# Altium PCB CLLC_PrimarySide_v8.PcbDoc
Units mm, origin at the board's own origin, x right, y up, seen from the top; angles counter-clockwise.
Board outline 143.4 x 151.8 mm, 4 copper layers (GND, SIG, HVDC, GND/OUTPUT), stack 1.369 mm thick; 86 components, 33 nets, 216 pads, 168 vias.
Unrouted connection lines stored in the file: 12.
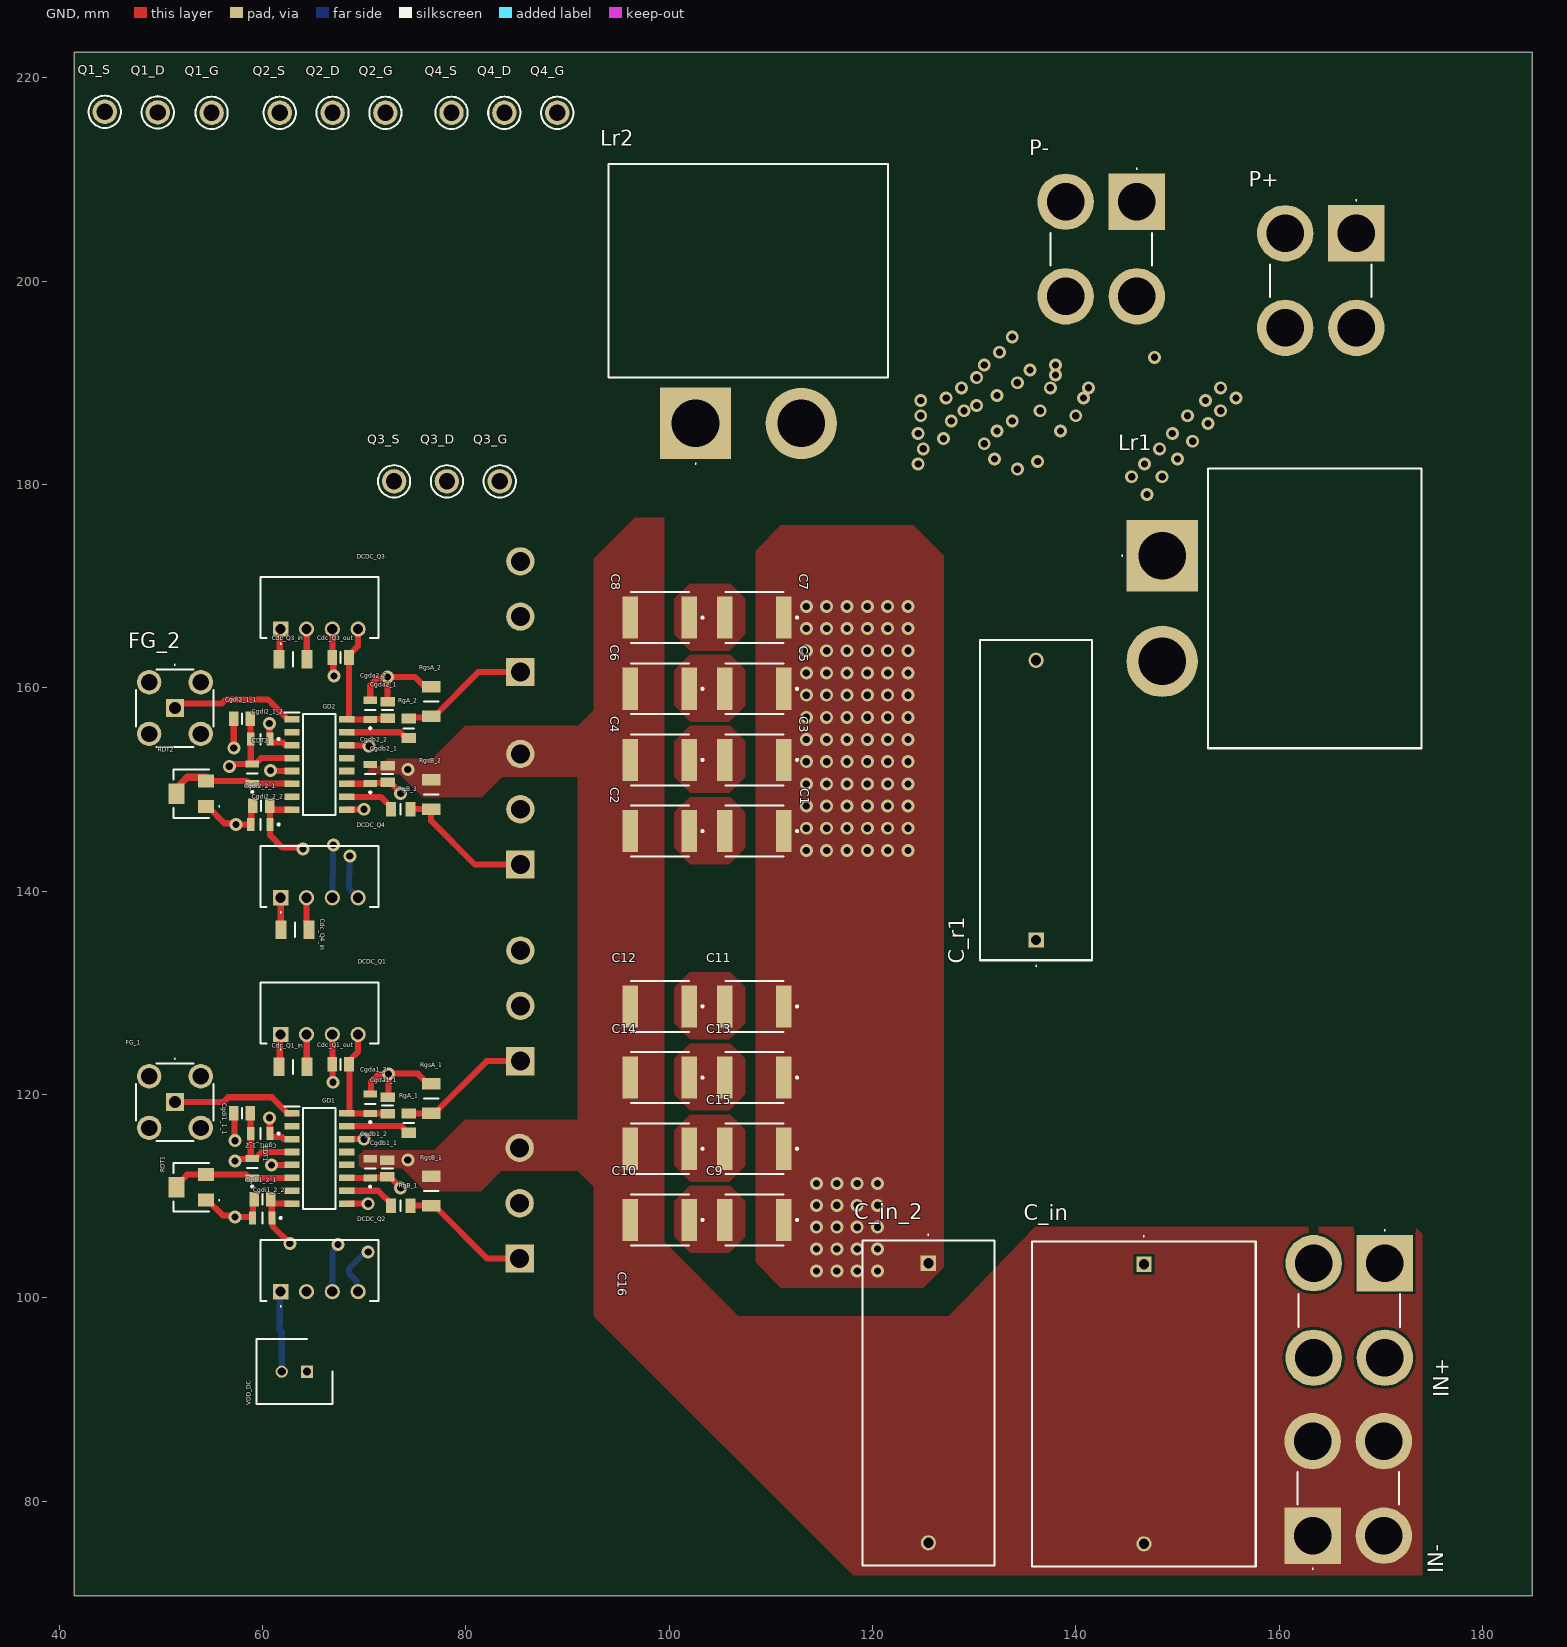
[diagram p0: GND view]
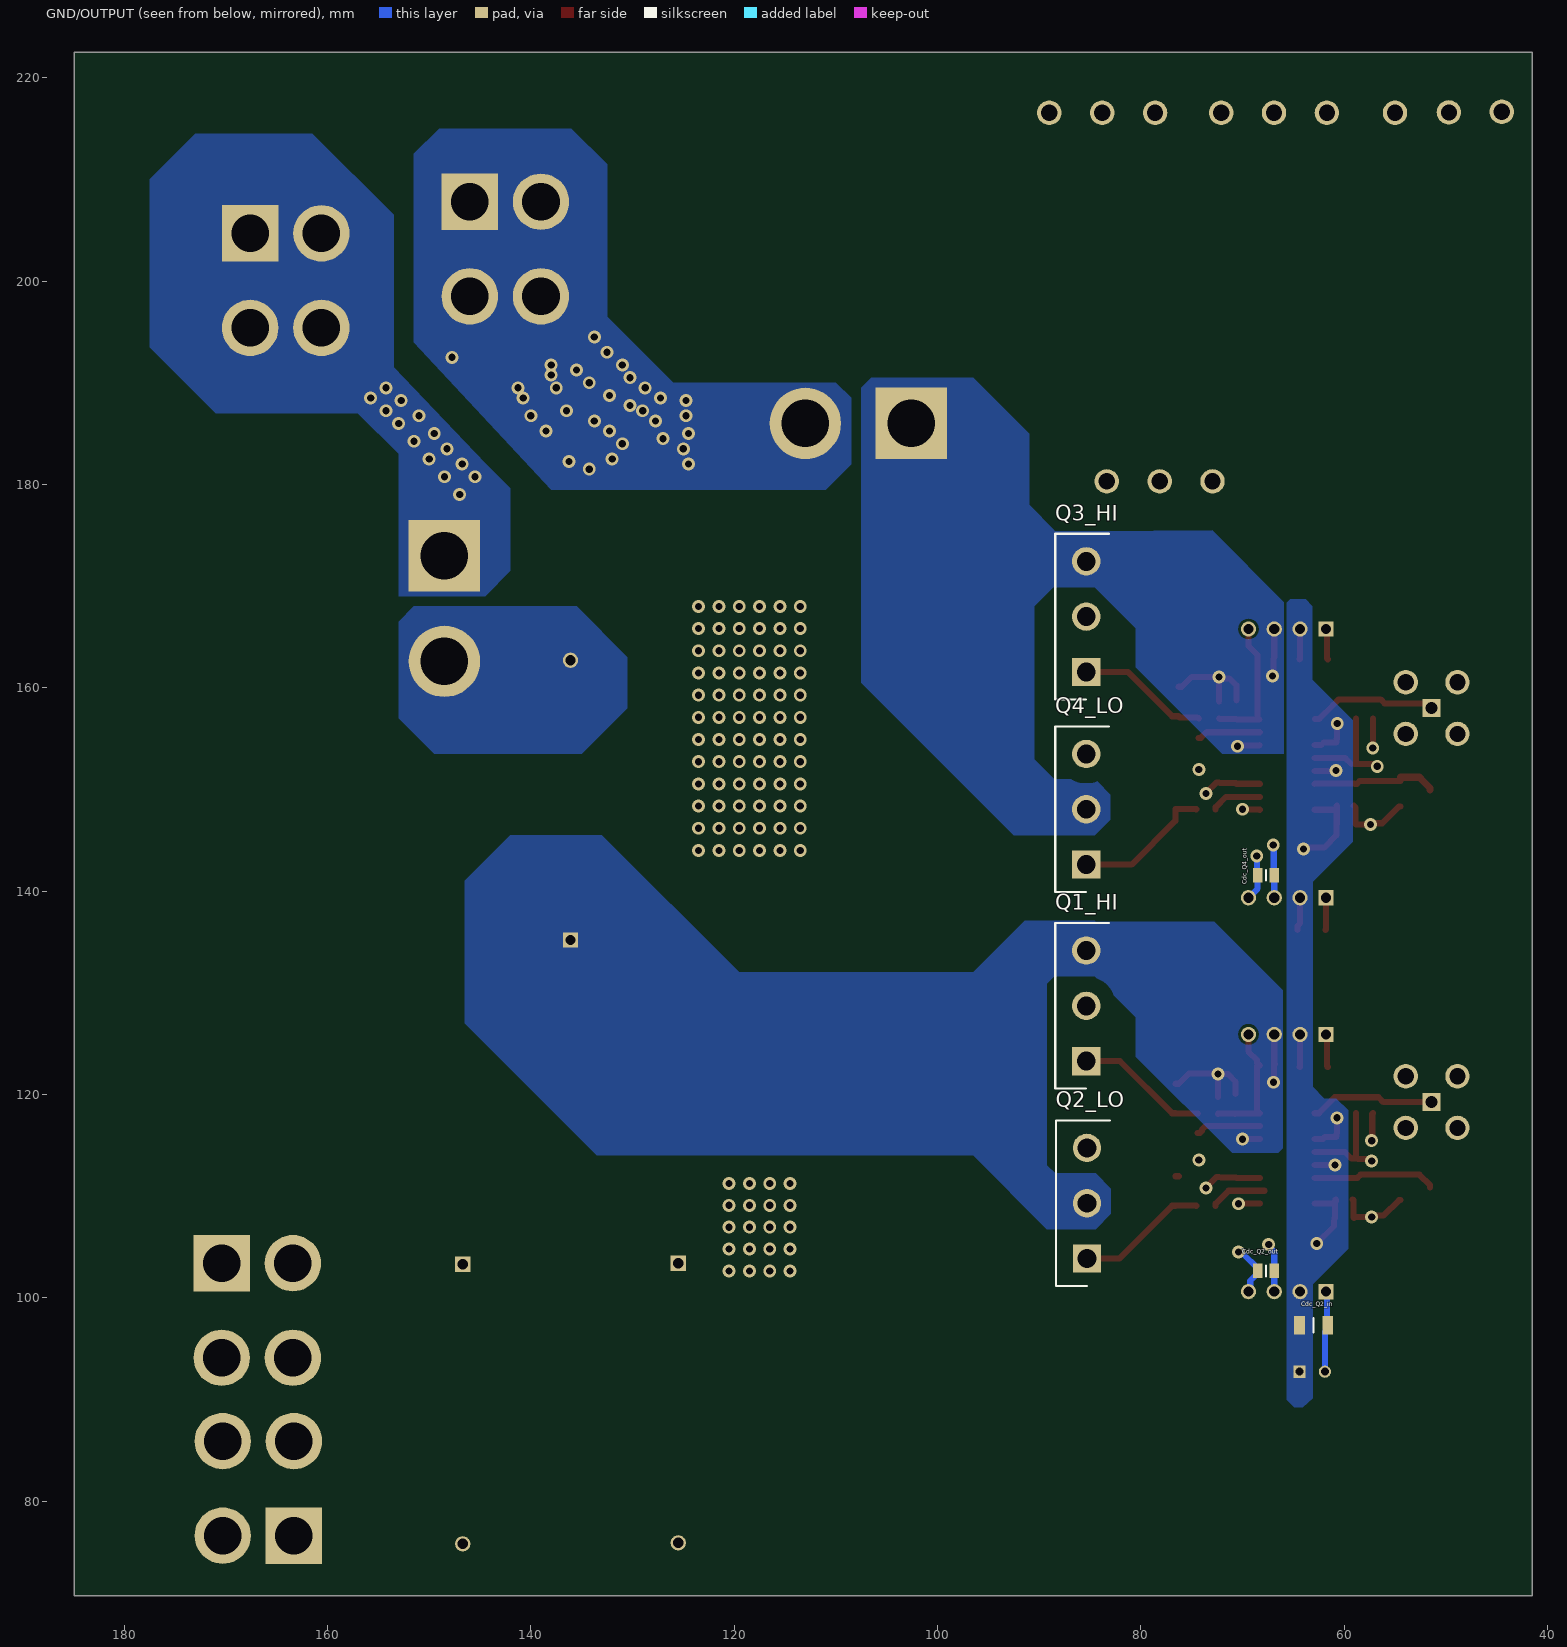
[diagram p1: GND/OUTPUT view, seen from below]
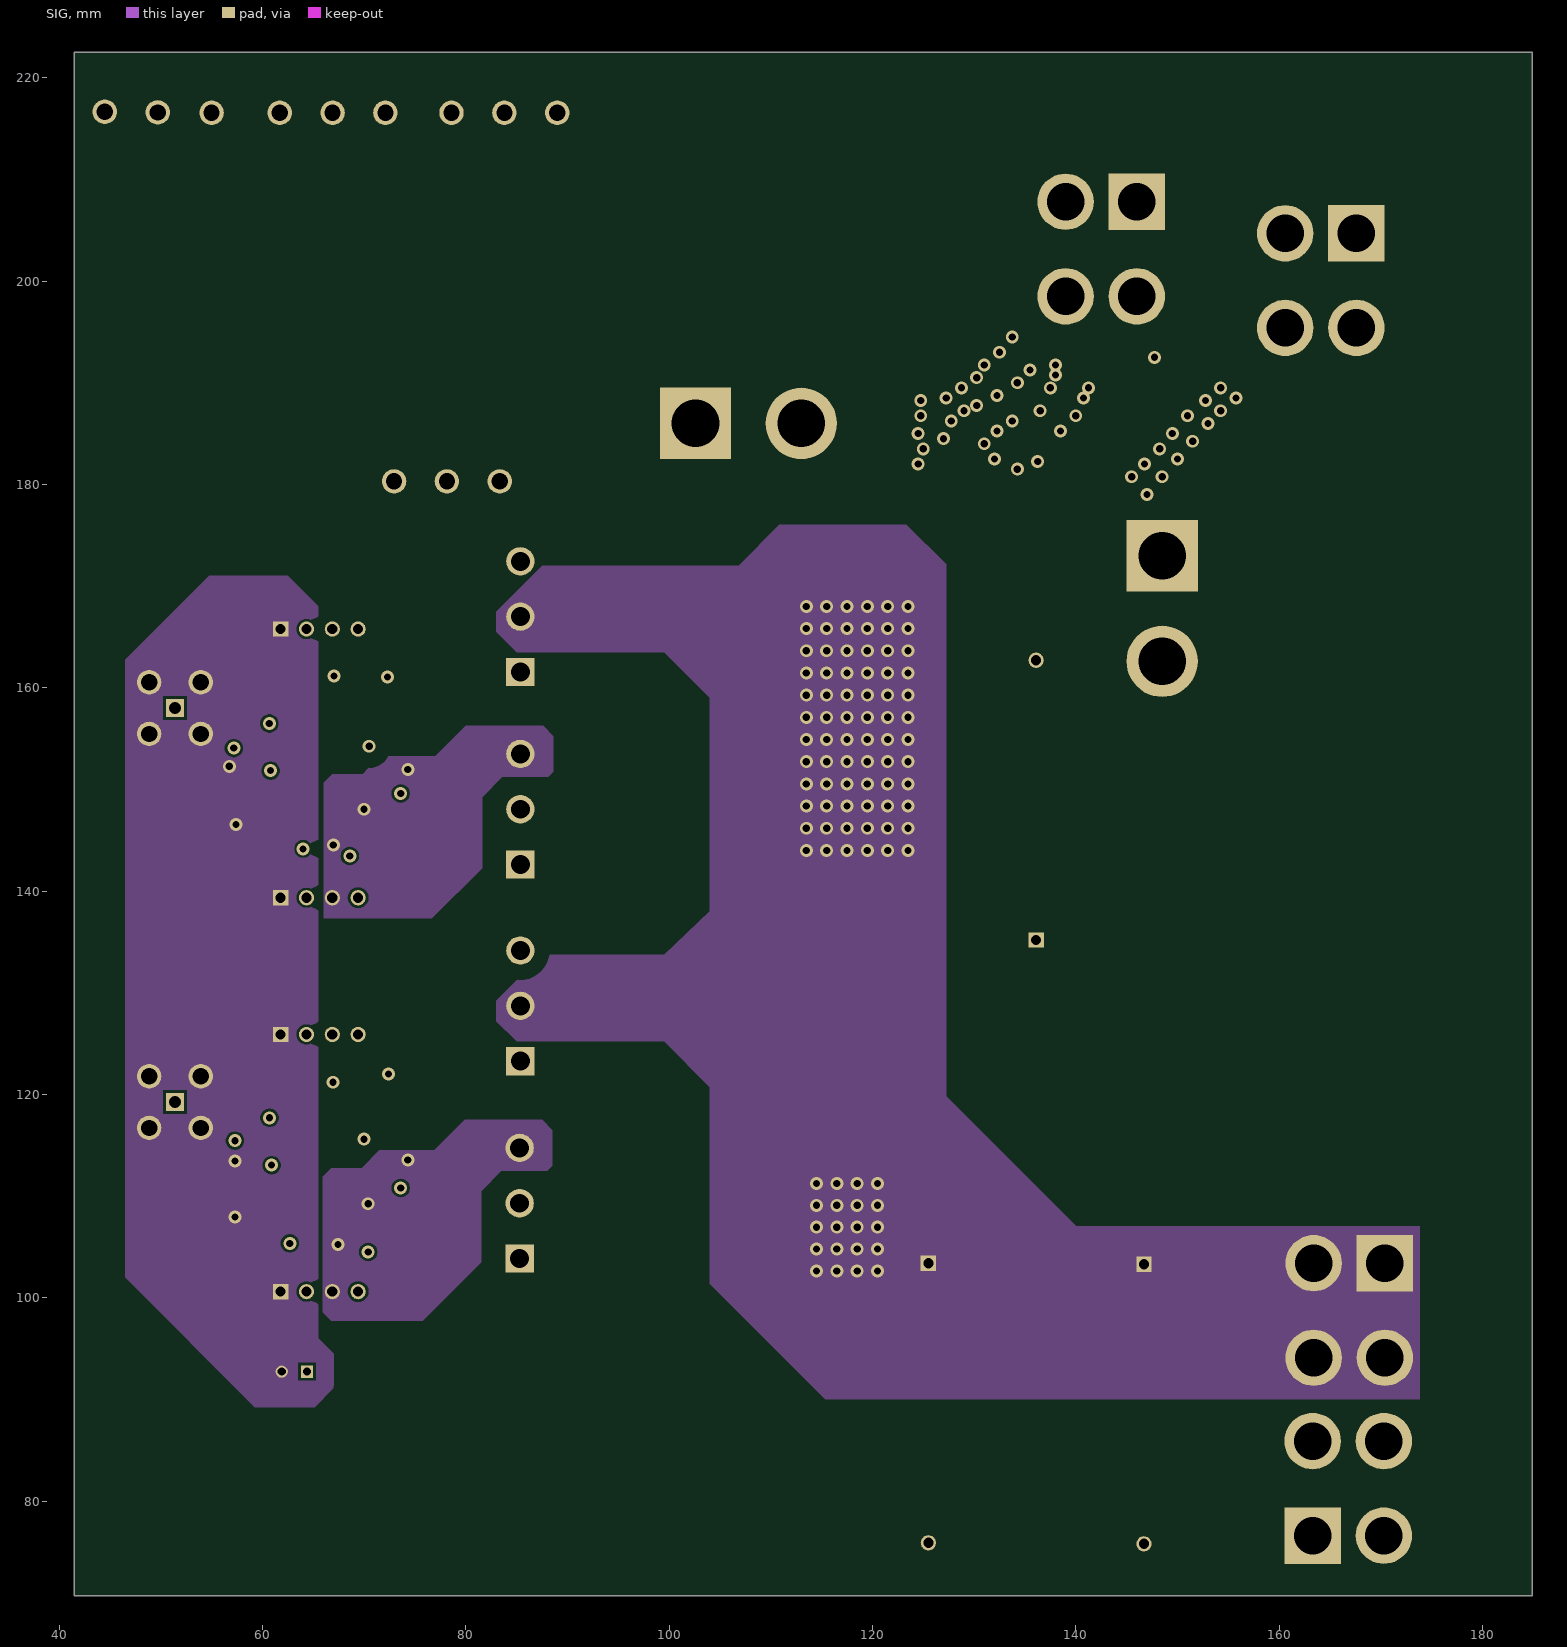
[diagram p2: SIG]
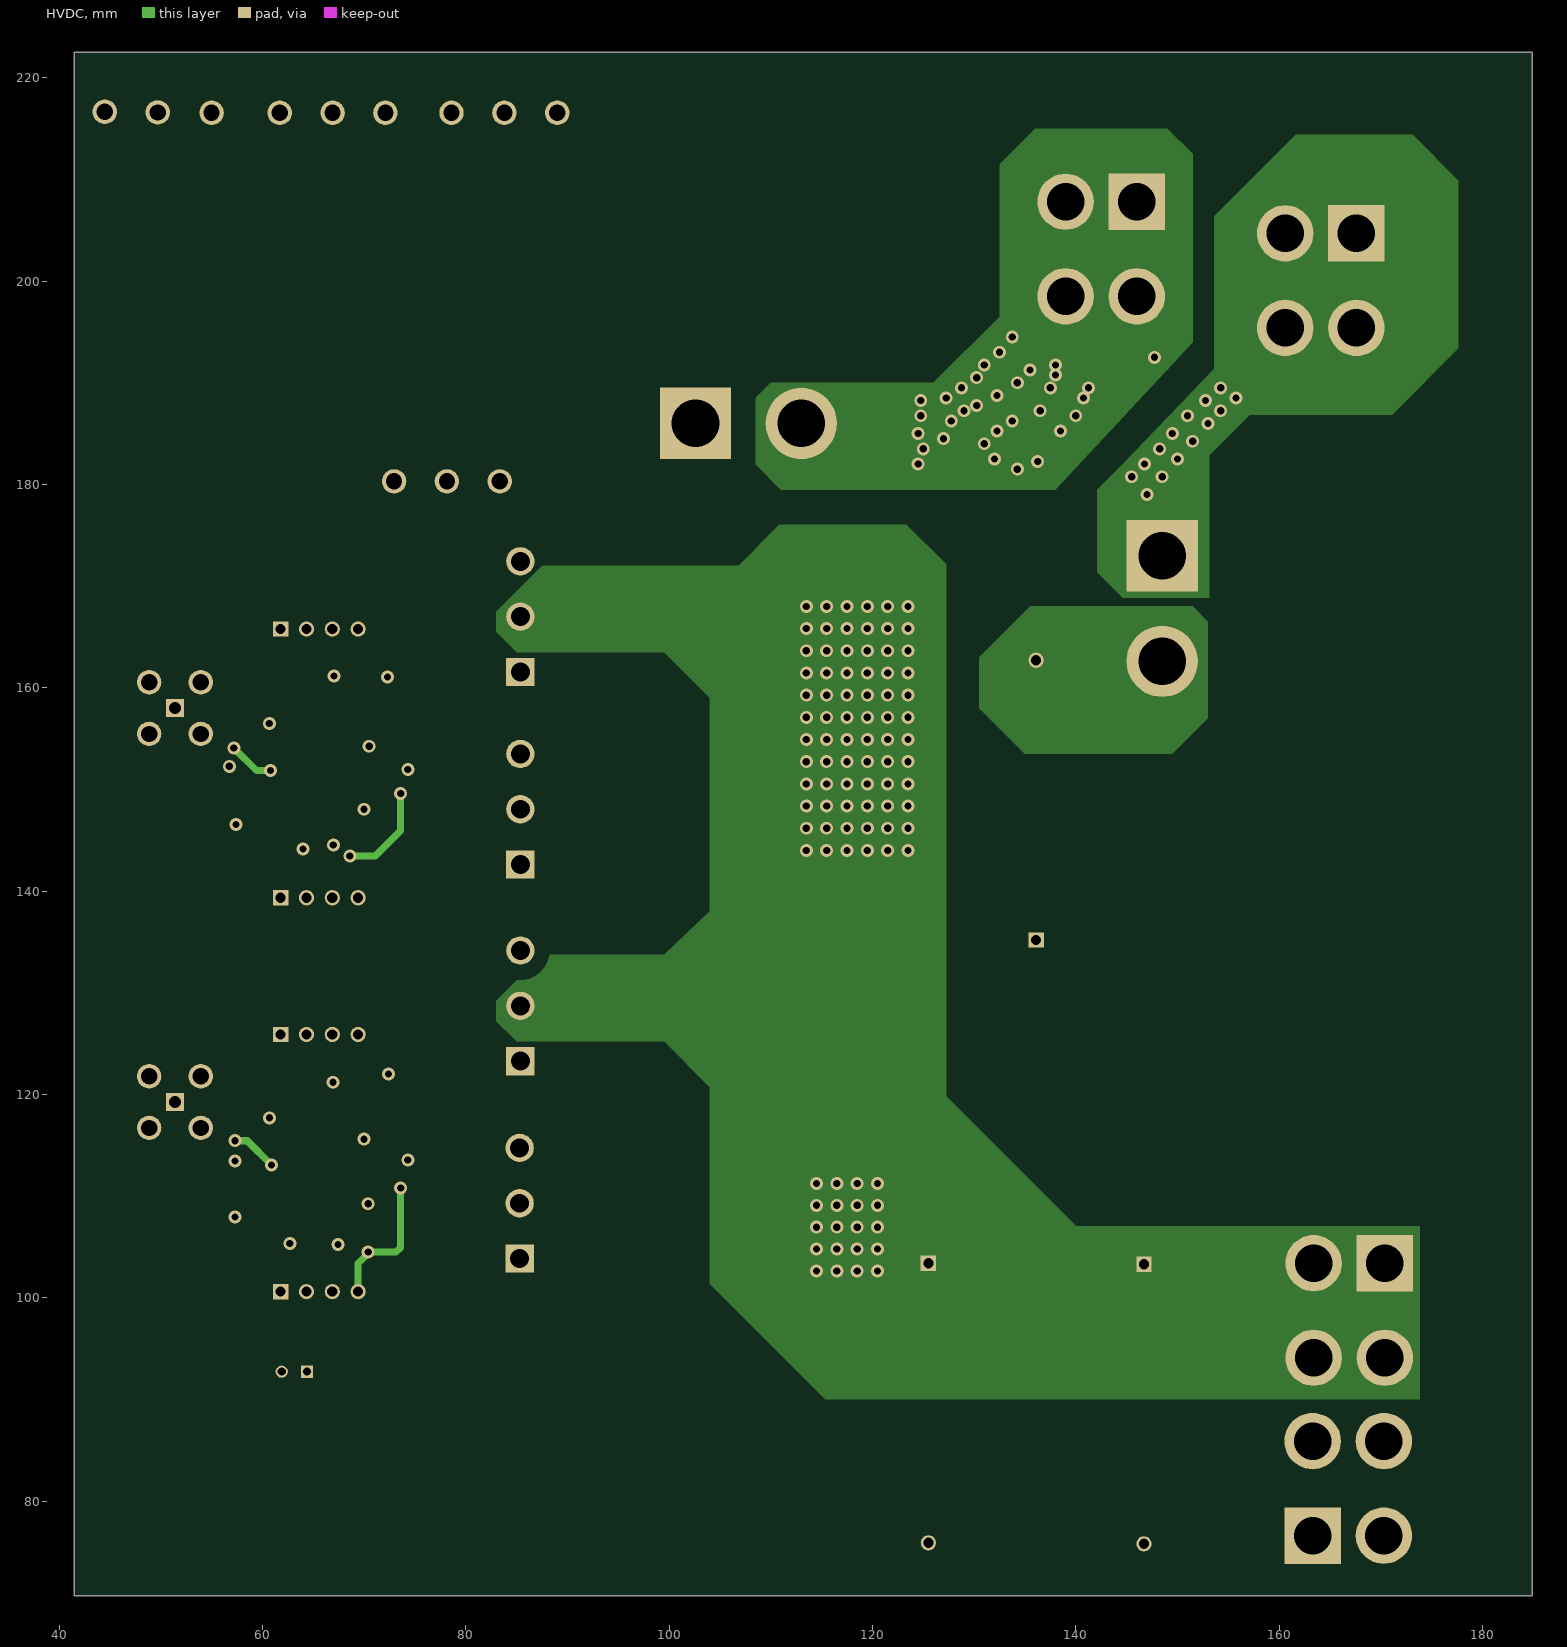
[diagram p3: HVDC]
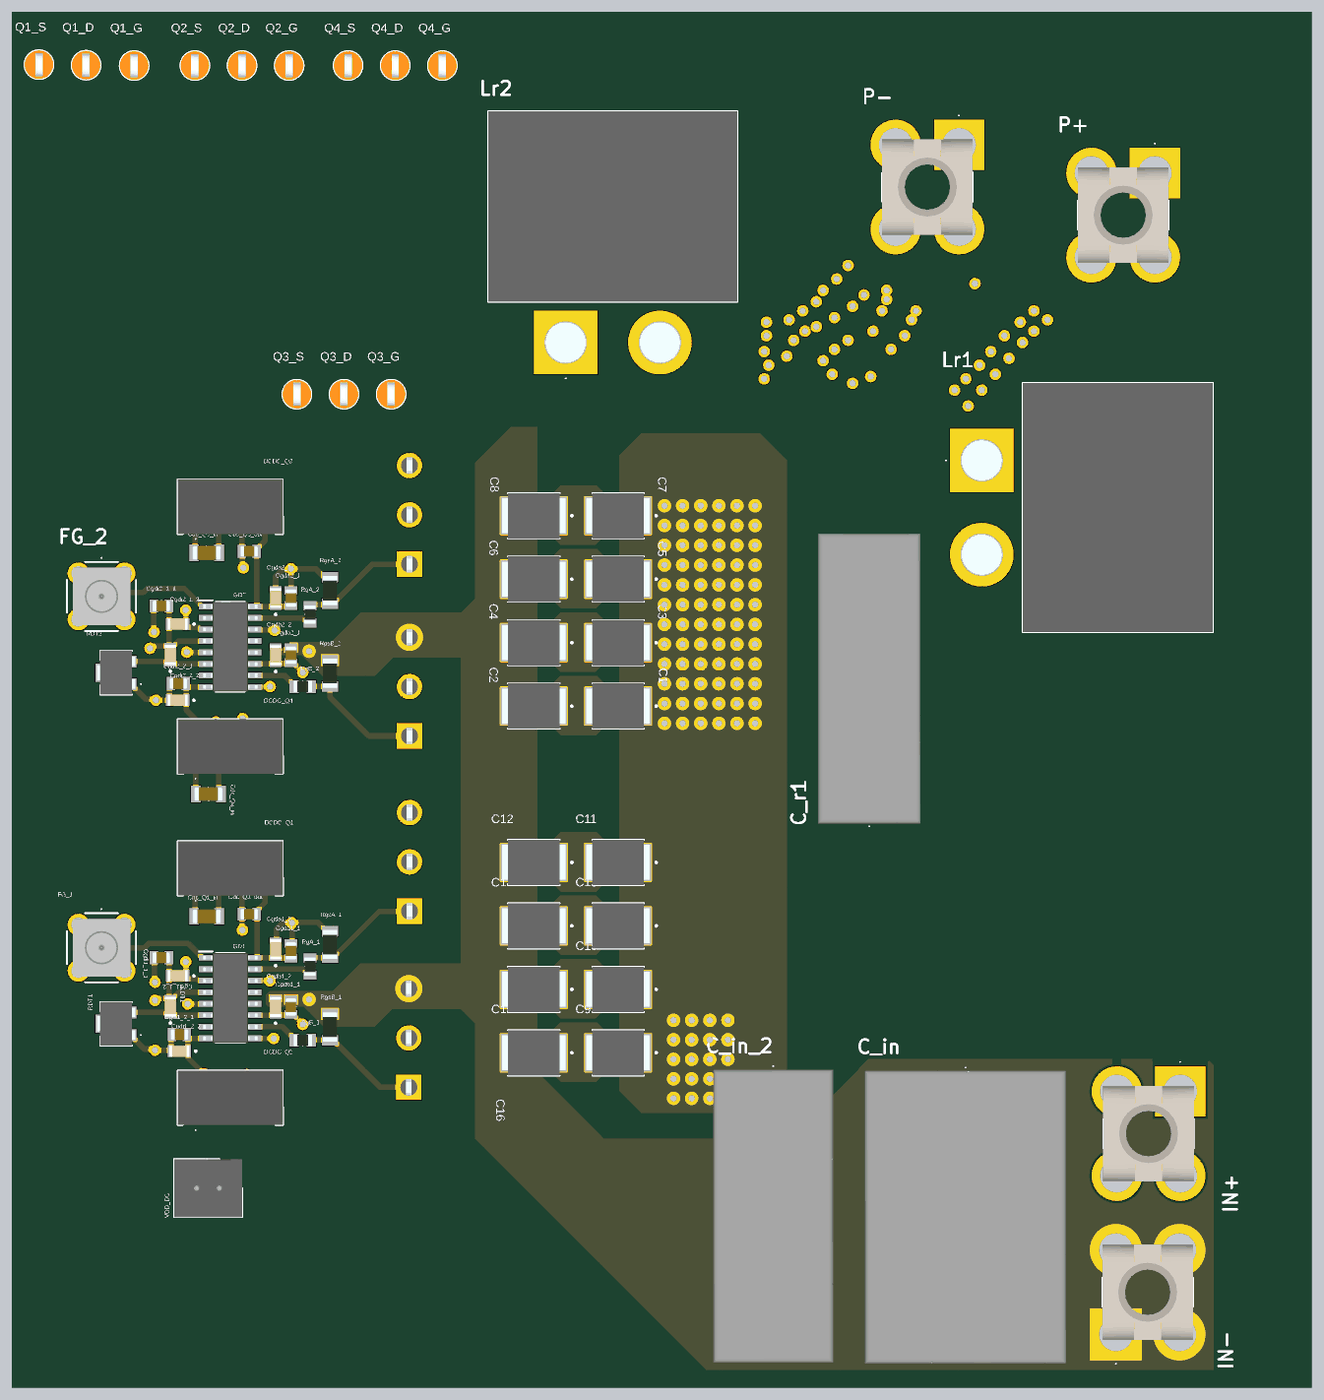
[diagram p4: 3D render of the assembled board from above, using the file's embedded part models]
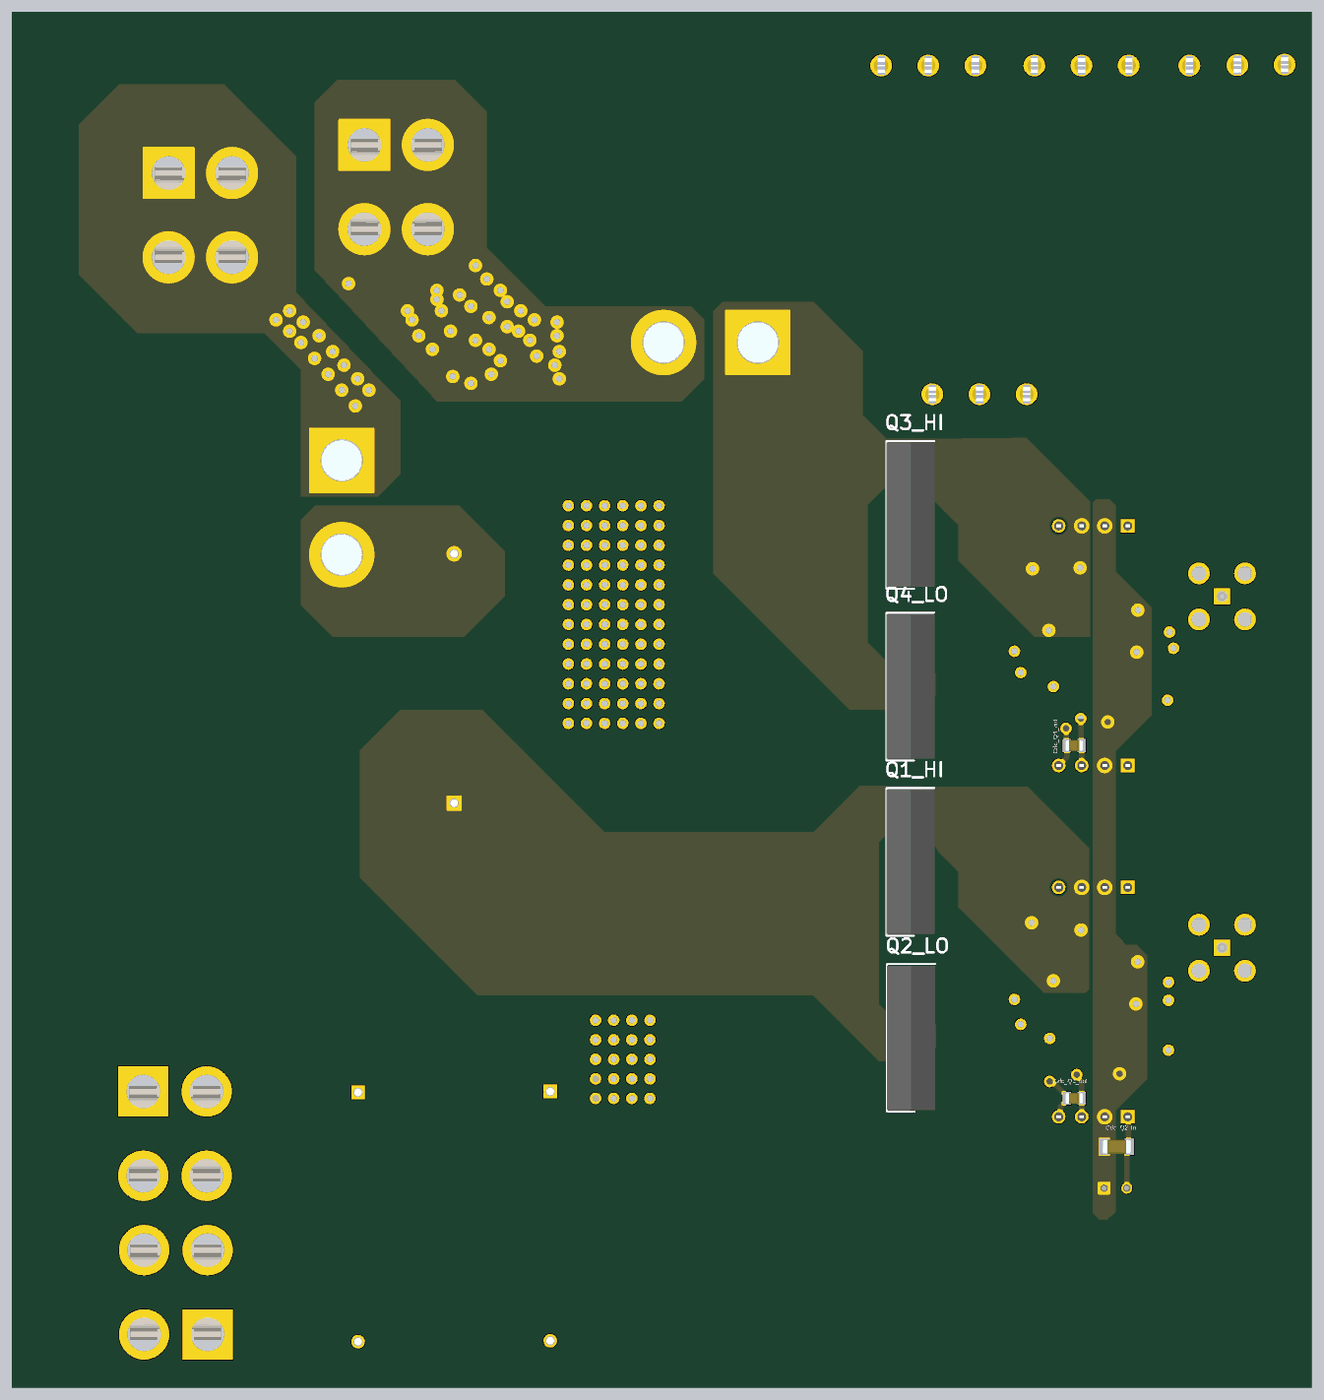
[diagram p5: 3D render of the assembled board from below, using the file's embedded part models]

## Layer stack, top to bottom
Top Solder: solder mask 0.0254, SM-001, Dk 4
GND: signal copper 0.035
Dielectric 1: prepreg 0.1295, PP-017, Dk 4.3
Dielectric 2: prepreg 0.1295, PP-017, Dk 4.3
SIG: signal copper 0.035
Dielectric 3: core 0.7112, Core-039, Dk 4.8
HVDC: signal copper 0.035
Dielectric 4: prepreg 0.1295, PP-017, Dk 4.3
Dielectric 5: prepreg 0.1295, PP-017, Dk 4.3
GND/OUTPUT: signal copper 0.035
Bottom Solder: solder mask 0.0254, SM-001, Dk 4

## Board outline
184.9,222.5 184.9,70.7 41.5,70.7 41.5,222.5

## Design rules (kind name [scope] priority, off if disabled: settings)
Clearance Clearance_2 [InNet('Q3_S') vs InNet('Q2_S')] p1: gap=1.5 ignorepadtopadclearanceinfootprint=FALSE
Clearance Clearance_1 [InNet('Q1_D') vs InNet('Q1_S')] p2: gap=1.5 ignorepadtopadclearanceinfootprint=FALSE
Clearance [All] p3: gap=0.254 ignorepadtopadclearanceinfootprint=FALSE
PolygonConnect PolygonConnect_5 [All vs IsNamedPolygon('GND-Q2_S') Or IsNamedPolygon('NONET_L01_P085') Or IsNamedPolygon('NONET_L01_P084') Or IsNamedPolygon('NONET_L01_P083') Or IsNamedPolygon('NONET_L01_P082') Or IsNamedPolygon('NONET_L01_P089') Or IsNamedPolygon('NONET_L01_P086') Or IsNamedPolygon('NONET_L01_P087') Or IsNamedPolygon('NONET_L01_P088') Or IsNamedPolygon('NONET_L01_P090') Or IsNamedPolygon('NONET_L02_P070') Or IsNamedPolygon('SIG-Q1_D') Or IsNamedPolygon('SIG-Q2_S') Or IsNamedPolygon('SIG-Q2_S') Or IsNamedPolygon('HVDC-No Net') Or IsNamedPolygon('NONET_L03_P048') Or IsNamedPolygon('NONET_L03_P080') Or IsNamedPolygon('NONET_L03_P047') Or IsNamedPolygon('GND/OUTPUT-Q1_S') Or IsNamedPolygon('GND/OUTPUT-Q3_S') Or IsNamedPolygon('NONET_L04_P074') Or IsNamedPolygon('NONET_L04_P067') Or IsNamedPolygon('NONET_L04_P049') Or IsNamedPolygon('NONET_L04_P066')] p1: connectstyle=Direct reliefconductorwidth=0.254 reliefentries=4 polygonreliefangle="90 Angle" airgapwidth=0.254
PolygonConnect PolygonConnect_4 [All vs IsNamedPolygon('GND-Q2_S') Or IsNamedPolygon('NONET_L02_P070') Or IsNamedPolygon('SIG-Q1_D') Or IsNamedPolygon('SIG-Q2_S') Or IsNamedPolygon('SIG-Q2_S 1') Or IsNamedPolygon('HVDC-No Net') Or IsNamedPolygon('NONET_L03_P048') Or IsNamedPolygon('NONET_L03_P080') Or IsNamedPolygon('NONET_L03_P047') Or IsNamedPolygon('GND/OUTPUT-Q1_S') Or IsNamedPolygon('GND/OUTPUT-Q3_S') Or IsNamedPolygon('NONET_L04_P074') Or IsNamedPolygon('NONET_L04_P067') Or IsNamedPolygon('NONET_L04_P049') Or IsNamedPolygon('NONET_L04_P066')] p2: connectstyle=Direct reliefconductorwidth=0.254 reliefentries=4 polygonreliefangle="90 Angle" airgapwidth=0.254
PolygonConnect PolygonConnect_3 [All vs IsNamedPolygon('NONET_L04_P070') Or IsNamedPolygon('NONET_L04_P080') Or IsNamedPolygon('NONET_L04_P083') Or IsNamedPolygon('NONET_L04_P082') Or IsNamedPolygon('NONET_L04_P081')] p3: connectstyle=Direct reliefconductorwidth=0.254 reliefentries=4 polygonreliefangle="90 Angle" airgapwidth=0.254
PolygonConnect PolygonConnect_2 [All vs IsNamedPolygon('NONET_L01_P074') Or IsNamedPolygon('NONET_L01_P033') Or IsNamedPolygon('NONET_L01_P032') Or IsNamedPolygon('NONET_L01_P076') Or IsNamedPolygon('Signal_1-Q1_D') Or IsNamedPolygon('GND-Q2_S') Or IsNamedPolygon('NONET_L02_P077') Or IsNamedPolygon('NONET_L02_P068') Or IsNamedPolygon('Int2 (PWR)-Q1_D') Or IsNamedPolygon('Int2 (PWR)-Q1_S') Or IsNamedPolygon('Int2 (PWR)-Q3_S') Or IsNamedPolygon('NONET_L03_P028') Or IsNamedPolygon('NONET_L03_P034') Or IsNamedPolygon('NETLR2_F1_L03_P035') Or IsNamedPolygon('NONET_L03_P056') Or IsNamedPolygon('NONET_L03_P079') Or IsNamedPolygon('NONET_L04_P024') Or IsNamedPolygon('NONET_L04_P026') Or IsNamedPolygon('NONET_L04_P027') Or IsNamedPolygon('NONET_L04_P070') Or IsNamedPolygon('NONET_L04_P023') Or IsNamedPolygon('NONET_L04_P021') Or IsNamedPolygon('NONET_L04_P058') Or IsNamedPolygon('Signal_2-Q1_S')] p4: connectstyle=Direct reliefconductorwidth=0.254 reliefentries=4 polygonreliefangle="90 Angle" airgapwidth=0.254
PolygonConnect PolygonConnect_1 [All vs IsNamedPolygon('Int2 (PWR)-Q1_S') Or IsNamedPolygon('Int2 (PWR)-Q1_S 1') Or IsNamedPolygon('NETC_R1_2_L03_P005')] p5: connectstyle=Direct reliefconductorwidth=0.254 reliefentries=4 polygonreliefangle="90 Angle" airgapwidth=0.254
PolygonConnect [All] p6: connectstyle=Relief reliefconductorwidth=0.254 reliefentries=4 polygonreliefangle="90 Angle" airgapwidth=0.254
RoutingVias [All] p1: holewidth=0.711 width=1.27 viastyle="Through Hole" minholewidth=0.711 minwidth=1.27 maxholewidth=0.711 maxwidth=1.27
SolderMaskExpansion [All] p1: expansion=0.102 istentingtop=FALSE
SupplyNets "Schematic Supply Nets_1" [InNet('Q2_S')] p1: voltage=0.000
Width [All] p1: maxlimit=0.7 minlimit=0.6 preferedwidth=0.7 toplayer_prefwidth=0.6 midlayer1_minwidth=0.7 midlayer2_minwidth=0.7 bottomlayer_maxwidth=0.6 bottomlayer_prefwidth=0.6 minimp=50.000000 maximp=50.000000 favimp=50.000000
30 further rules are at their usual default settings.

## Classes and differential pairs
component class GD: Cdc_Q1_in Cdc_Q1_out Cdc_Q2_in Cdc_Q2_out Cdc_Q3_in Cdc_Q3_out Cdc_Q4_in Cdc_Q4_out CDT1 CDT2 Cgda1_1 Cgda1_2 Cgda2_1 Cgda2_2 Cgdb1_1 Cgdb1_2 Cgdb2_1 Cgdb2_2 Cgdi1_1_1 Cgdi1_1_2 Cgdi1_2_1 Cgdi1_2_2 Cgdi2_1_1 Cgdi2_1_2 Cgdi2_2_1 Cgdi2_2_2 DCDC_Q1 DCDC_Q2 DCDC_Q3 DCDC_Q4 FG_1 FG_2 GD1 GD2 RDT1 RDT2 RgA_1 RgA_2 RgB_1 RgB_2 RgsA_1 RgsA_2 RgsB_1 RgsB_2 VDD_DC
component class PrimarySide: C1 C2 C3 C4 C5 C6 C7 C8 C9 C10 C11 C12 C13 C14 C15 C16 C_in C_in_2 C_r1 IN+ IN- Lr1 Lr2 P+ P- Q1_D Q1_G Q1_HI Q1_S Q2_D Q2_G Q2_LO Q2_S Q3_D Q3_G Q3_HI Q3_S Q4_D Q4_G Q4_LO Q4_S

## Components (designator, comment, footprint, x,y, rotation, side; value= is the part's Value field where it differs from the comment)
C1 "GCJ55DR7LV474KW01K" GCJ55D 108.387,145.9 r180 top
C2 "GCJ55DR7LV474KW01K" GCJ55D 99.087,145.9 r180 top
C3 "GCJ55DR7LV474KW01K" GCJ55D 108.387,152.9 r180 top
C4 "GCJ55DR7LV474KW01K" GCJ55D 99.087,152.9 r180 top
C5 "GCJ55DR7LV474KW01K" GCJ55D 108.387,159.9 r180 top
C6 "GCJ55DR7LV474KW01K" GCJ55D 99.087,159.9 r180 top
C7 "GCJ55DR7LV474KW01K" GCJ55D 108.387,166.9 r180 top
C8 "GCJ55DR7LV474KW01K" GCJ55D 99.087,166.9 r180 top
C9 "GCJ55DR7LV474KW01K" GCJ55D 108.387,107.66 r180 top
C10 "GCJ55DR7LV474KW01K" GCJ55D 99.087,107.66 r180 top
C11 "GCJ55DR7LV474KW01K" GCJ55D 108.387,128.66 r180 top
C12 "GCJ55DR7LV474KW01K" GCJ55D 99.087,128.66 r180 top
C13 "GCJ55DR7LV474KW01K" GCJ55D 108.387,121.66 r180 top
C14 "GCJ55DR7LV474KW01K" GCJ55D 99.087,121.66 r180 top
C15 "GCJ55DR7LV474KW01K" GCJ55D 108.387,114.66 r180 top
C16 "GCJ55DR7LV474KW01K" GCJ55D 99.087,114.66 r180 top
C_in "R60MR51005040K" R60MR51005040K 146.7,103.3 r270 top
C_in_2 "R76MR4100SE40K" R76MR4100SE40K 125.5,103.4 r270 top
C_r1 "C4AQQBU4140M1WJ" C4AQQBU4140M1WJ 136.1,135.2 r90 top
Cdc_Q1_in "GRM31CR71H475KA12L" CAPC3216X180N 63,122.7 r180 top
Cdc_Q1_out "GCM21BR71H105KA03L" CAPC2012X140N 67.696,122.95 r180 top
Cdc_Q2_in "GRM31CR71H475KA12L" CAPC3216X180N 63,97.3 r180 bottom
Cdc_Q2_out "GCM21BR71H105KA03L" CAPC2012X140N 67.696,102.639 r180 bottom
Cdc_Q3_in "GRM31CR71H475KA12L" CAPC3216X180N 63,162.8 r180 top
Cdc_Q3_out "GCM21BR71H105KA03L" CAPC2012X140N 67.696,162.975 r180 top
Cdc_Q4_in "GRM31CR71H475KA12L" CAPC3216X180N 63.2,136.2 r180 top
Cdc_Q4_out "GCM21BR71H105KA03L" CAPC2012X140N 67.696,141.55 r180 bottom
CDT1 "GCM21BR72A104MA37K" GCM21 59,112.75 r90 top
CDT2 "GCM21BR72A104MA37K" GCM21 59,151.55 r90 top
Cgda1_1 "GCM21BR71H105KA03L" CAPC2012X140N 72.307,118.915 r90 top
Cgda1_2 "GCM21BR72A104MA37K" GCM21 70.607,119.075 r90 top
Cgda2_1 "GCM21BR71H105KA03L" CAPC2012X140N 72.307,157.815 r90 top
Cgda2_2 "GCM21BR72A104MA37K" GCM21 70.607,157.82 r90 top
Cgdb1_1 "GCM21BR71H105KA03L" CAPC2012X140N 72.3,112.715 r90 top
Cgdb1_2 "GCM21BR72A104MA37K" GCM21 70.6,112.725 r90 top
Cgdb2_1 "GCM21BR71H105KA03L" CAPC2012X140N 72.307,151.515 r90 top
Cgdb2_2 "GCM21BR72A104MA37K" GCM21 70.607,151.515 r90 top
Cgdi1_1_1 "GCM21BR71H105KA03L" CAPC2012X140N 58,118.15 r0 top
Cgdi1_1_2 "GCM21BR72A104MA37K" GCM21 59.8,116.15 r180 top
Cgdi1_2_1 "GCM21BR71H105KA03L" CAPC2012X140N 60,109.679 r180 top
Cgdi1_2_2 "GCM21BR72A104MA37K" GCM21 59.99,107.857 r180 top
Cgdi2_1_1 "GCM21BR71H105KA03L" CAPC2012X140N 58,156.95 r0 top
Cgdi2_1_2 "GCM21BR72A104MA37K" GCM21 59.8,154.95 r180 top
Cgdi2_2_1 "GCM21BR71H105KA03L" CAPC2012X140N 59.884,148.395 r180 top
Cgdi2_2_2 "GCM21BR72A104MA37K" GCM21 59.8,146.55 r180 top
DCDC_Q1 "PQS075-S5-S15-S" PQS075S5S15S 61.796,125.905 r0 top
DCDC_Q2 "PQS075-S5-S15-S" PQS075S5S15S 61.796,100.605 r0 top
DCDC_Q3 "PQS075-S5-S15-S" PQS075S5S15S 61.796,165.775 r0 top
DCDC_Q4 "PQS075-S5-S15-S" PQS075S5S15S 61.796,139.35 r0 top
FG_1 "413990-1" 4139901 51.4,119.25 r270 top
FG_2 "413990-1" 4139901 51.4,158 r270 top
GD1 "SI8274GB4D-IS1" SOIC127P600X175-16N 65.606,113.705 r0 top
GD2 "SI8274GB4D-IS1" SOIC127P600X175-16N 65.606,152.45 r0 top
IN+ "AMT0450028DB0000G" AMT0450028DB0000G 170.4,103.4 r180 top
IN- "AMT0450028DB0000G" AMT0450028DB0000G 163.3,76.6 r0 top
Lr1 "ER26A2DC-6R8K" ER26A2DC6R8K 148.5,173 r270 top
Lr2 "ER26A2DC-6R8K" ER26A2DC6R8K 102.6,186 r0 top
P+ "AMT0450028DB0000G" AMT0450028DB0000G 167.6,204.7 r180 top
P- "AMT0450028DB0000G" AMT0450028DB0000G 146,207.8 r180 top
Q1_D "5013" 5013 49.7,216.59 r270 top
Q1_G "5013" 5013 55,216.55 r270 top
Q1_HI "IPW65R050CFD7AXKSA1" TO544P530X1590X2600-3P 85.373,123.277 r90 bottom
Q1_S "5013" 5013 44.5,216.65 r270 top
Q2_D "5013" 5013 66.9,216.55 r270 top
Q2_G "5013" 5013 72.1,216.55 r270 top
Q2_LO "IPW65R050CFD7AXKSA1" TO544P530X1590X2600-3P 85.3,103.86 r90 bottom
Q2_S "5013" 5013 61.7,216.55 r270 top
Q3_D "5013" 5013 78.15,180.3 r270 top
Q3_G "5013" 5013 83.35,180.3 r270 top
Q3_HI "IPW65R050CFD7AXKSA1" TO544P530X1590X2600-3P 85.373,161.557 r90 bottom
Q3_S "5013" 5013 72.95,180.3 r270 top
Q4_D "5013" 5013 83.8,216.55 r270 top
Q4_G "5013" 5013 89,216.55 r270 top
Q4_LO "IPW65R050CFD7AXKSA1" TO544P530X1590X2600-3P 85.373,142.61 r90 bottom
Q4_S "5013" 5013 78.6,216.55 r270 top
RDT1 "3224W-1-104G" 3224W1104G 53,110.864 r180 top
RDT2 "3224W-1-104G" 3224W1104G 53,149.58 r180 top
RgA_1 "ESR10EZPF15R0" RESC2012X65N 74.4,117.175 r90 top
RgA_2 "ESR10EZPF15R0" RESC2012X65N 74.4,156.015 r90 top
RgB_1 "ESR10EZPF15R0" RESC2012X65N 73.6,109.05 r0 top
RgB_2 "ESR10EZPF15R0" RESC2012X65N 73.6,148.05 r0 top
RgsA_1 "ESR18EZPF1002" RESC3216X65N 76.6,119.6 r90 top
RgsA_2 "ESR18EZPF1002" RESC3216X65N 76.6,158.65 r90 top
RgsB_1 "ESR18EZPF1002" RESC3216X65N 76.6,110.5 r90 top
RgsB_2 "ESR18EZPF1002" RESC3216X65N 76.6,149.515 r90 top
VDD_DC "B02B-XASK-1_LF__SN_" SHDR2W60P0X250_1X2_750X640X880P 64.4,92.734 r180 top

## Footprints (in the part's own frame and the unit in brackets; to place one, negate y for a bottom-side part, rotate by r counter-clockwise, add the part's x,y. Pads: shape width x height; smd on the part's side, far side on the other; paste and mask are expansions set on the pad)
3224W1104G [mm]
  rect 1.6x1.3 smd: 1(-1.45,1.25) 3(-1.45,-1.25)
  rect 1.6x2 smd: 2(1.45,0)
  silkscreen extent -2.8,-2.4 1.75,2.4, body extent -2.12,-2.4 2.09,2.4, height 5.65
5013 [mm]
  round 2.4 hole 1.6: 1(0,0)
  silkscreen extent -1.59,-1.59 1.59,1.59, body extent -1.58,-1.59 1.58,1.59, height 8.63
4139901 [mm]
  rect 1.785x1.785 hole 1.19: 1(0,0)
  round 2.4 hole 1.6: 2(-2.54,-2.54) 3(2.54,-2.54) 4(2.54,2.54) 5(-2.54,2.54)
  silkscreen extent -4.3,-3.81 3.81,3.81, body extent -3.18,-3.18 3.18,3.17, height 8.05
AMT0450028DB0000G [mm]
  rect 5.55x5.55 hole 3.7: 1(0,0)
  round 5.55 hole 3.7: 2(0,9.3) 3(7,0) 4(7,9.3)
  silkscreen extent -1.5,-3.3 8.5,6.25, body extent -1.5,-0.6 8.5,9.9, height 7.59
C4AQQBU4140M1WJ [mm]
  rect 1.5x1.5 hole 1: 1(0,0)
  round 1.5 hole 1: 2(27.5,0)
  silkscreen extent -2.6,-5.5 29.5,5.5, body extent -2.25,-5.66 29.75,5.65, height 20.16
CAPC2012X140N [mm]
  rect 0.94x1.43 smd: 1(-0.82,0) 2(0.82,0)
  silkscreen extent 0,-0.53 0,0.53, body extent -1,-0.63 1,0.63, height 1.4
CAPC3216X180N [mm]
  rect 1.07x1.82 smd: 1(-1.38,0) 2(1.38,0)
  silkscreen extent 0,-0.7 0,0.7, body extent -1.6,-0.8 1.6,0.8, height 1.8
ER26A2DC6R8K [mm]
  round 7.02 hole 4.68: F1(10.4,0)
  rect 7.02x7.02 hole 4.68: S1(0,0)
  silkscreen extent -8.55,-4 18.95,25.5, body extent -8.55,-2.23 18.95,25.5, height 17.1
GCJ55D [mm]
  rect 1.5x4.15 smd: 1(-2.9,0) 2(2.9,0)
  silkscreen extent -4.3,-2.5 2.85,2.5, body extent -3.5,-2.5 3.5,2.5, height 2.1
GCM21 [mm]
  rect 0.7x1.3 smd: 1(-0.95,0) 2(0.95,0)
  silkscreen extent -1.9,-0.53 0,0.53, body extent -1.1,-0.63 1.1,0.63, height 1.45
PQS075S5S15S [mm]
  rect 1.5x1.5 hole 1: 1(0,0)
  round 1.5 hole 1: 2(2.54,0) 3(5.08,0) 4(7.62,0)
  silkscreen extent -1.99,-1.5 9.61,5.1, body extent -1.99,-0.89 9.61,5.1, height 10.26
R60MR51005040K [mm]
  rect 1.5x1.5 hole 1: 1(0,0)
  round 1.5 hole 1: 2(27.5,0)
  silkscreen extent -2.8,-11 29.75,11, body extent -2.4,-11.11 29.9,11.1, height 37.1
R76MR4100SE40K [mm]
  rect 1.5x1.5 hole 1: 1(0,0)
  round 1.5 hole 1: 2(27.5,0)
  silkscreen extent -2.85,-6.5 29.75,6.5, body extent -2.4,-6.61 29.9,6.6, height 23.39
RESC2012X65N [mm]
  rect 1x1.4 smd: 1(-0.95,0) 2(0.95,0)
  silkscreen extent 0,-0.53 0,0.53, body extent -1,-0.63 1,0.63, height 0.65
RESC3216X65N [mm]
  rect 1.15x1.8 smd: 1(-1.45,0) 2(1.45,0)
  silkscreen extent 0,-0.7 0,0.7, body extent -1.6,-0.8 1.6,0.8, height 0.65
SHDR2W60P0X250_1X2_750X640X880P [mm]
  rect 1.2x1.2 hole 0.8: 1(0,0)
  round 1.2 hole 0.8: 2(2.5,0)
  silkscreen extent -2.5,-3.2 5,3.2, body extent -2.5,-3.2 5,3.2, height 8.8
SOIC127P600X175-16N [mm]
  rect 1.5x0.65 smd: 1(-2.7,4.445) 2(-2.7,3.175) 3(-2.7,1.905) 4(-2.7,0.635) 5(-2.7,-0.635) 6(-2.7,-1.905) 7(-2.7,-3.175) 8(-2.7,-4.445) 9(2.7,-4.445) 10(2.7,-3.175) 11(2.7,-1.905) 12(2.7,-0.635) 13(2.7,0.635) 14(2.7,1.905) 15(2.7,3.175) 16(2.7,4.445)
  silkscreen extent -3.45,-4.95 1.6,5.12, body extent -3,-4.95 3,4.95, height 1.75
TO544P530X1590X2600-3P [mm]
  rect 2.79x2.79 hole 1.86: 1(0,0)
  round 2.79 hole 1.86: 2(5.44,0) 3(10.88,0)
  silkscreen extent -2.71,-2.25 13.59,3.05, body extent -2.51,-2.26 13.39,3.05, height 26

## Part data
C1 C2 C3 C4 C5 C6 C7 C8 C9 C10 C11 C12 C13 C14 C15 C16: "Capacitor", Manufacturer_Name="Murata Electronics", Mouser Part Number=81-GCJ55D7LV474KW01K, Datasheet Link=https://search.murata.co.jp/Ceramy/image/img/A01X/G101/ENG/GCJ55DR7LV474KW01-00B.pdf, Height=2mm, Manufacturer_Part_Number=GCJ55DR7LV474KW01K, Mouser Price/Stock=https://www.mouser.co.uk/ProductDetail/Murata-Electronics/GCJ55DR7LV474KW01K?qs=By6Nw2ByBD00cj4z4sTn5Q%3D%3D
C_in: "Capacitor", Manufacturer_Name=KEMET, Mouser Part Number=80-R60MR51005040K, Datasheet Link=https://content.kemet.com/datasheets/KEM_F3103_R60.pdf, Height=37.1mm, Manufacturer_Part_Number=R60MR51005040K, Mouser Price/Stock=https://www.mouser.com/Search/Refine.aspx?Keyword=80-R60MR51005040K
C_in_2: "Capacitor", Manufacturer_Name=KEMET, Mouser Part Number=80-R76MR4100SE40K, Arrow Part Number=R76MR4100SE40K, Arrow Price/Stock=https://www.arrow.com/en/products/r76mr4100se40k/kemet-corporation, Datasheet Link=https://search.kemet.com/component-documentation/download/specsheet/R76MR4100SE40K, Height=22.1mm, Manufacturer_Part_Number=R76MR4100SE40K, Mouser Price/Stock=https://www.mouser.com/Search/Refine.aspx?Keyword=80-R76MR4100SE40K
C_r1: "Capacitor", Manufacturer_Name=KEMET, Mouser Part Number=80-C4AQQBU4140M1WJ, Datasheet Link=https://search.kemet.com/component-documentation/download/specsheet/C4AQQBU4140M1WJ, Height=20.2mm, Manufacturer_Part_Number=C4AQQBU4140M1WJ, Mouser Price/Stock=https://www.mouser.co.uk/ProductDetail/KEMET/C4AQQBU4140M1WJ?qs=81r%252BiQLm7BSMlBltxrghzA%3D%3D
Cdc_Q1_in Cdc_Q2_in Cdc_Q3_in Cdc_Q4_in: "Capacitor", Manufacturer_Name="Murata Electronics", Mouser Part Number=81-GRM31CR71H475KA2L, Arrow Part Number=GRM31CR71H475KA12L, Arrow Price/Stock=https://www.arrow.com/en/products/grm31cr71h475ka12l/murata-manufacturing?utm_currency=USD&region=nac, Datasheet Link=https://search.murata.co.jp/Ceramy/image/img/A01X/G101/ENG/GRM31CR71H475KA12-01A.pdf, Height=1.8mm, Manufacturer_Part_Number=GRM31CR71H475KA12L, Mouser Price/Stock=https://www.mouser.co.uk/ProductDetail/Murata-Electronics/GRM31CR71H475KA12L?qs=QOxk%252BkhTc6I%252BVQUsJuOHog%3D%3D
Cdc_Q1_out Cdc_Q2_out Cdc_Q3_out Cdc_Q4_out Cgda1_1 Cgda2_1 Cgdb1_1 Cgdb2_1 Cgdi1_1_1 Cgdi1_2_1 Cgdi2_1_1 Cgdi2_2_1: "Capacitor", Manufacturer_Name="Murata Electronics", Mouser Part Number=81-GCM21BR71H105KA3L, Arrow Part Number=GCM21BR71H105KA03L, Arrow Price/Stock=https://www.arrow.com/en/products/gcm21br71h105ka03l/murata-manufacturing?utm_currency=USD&region=nac, Datasheet Link=https://search.murata.co.jp/Ceramy/image/img/A01X/G101/ENG/GCM21BR71H105KA03-01A.pdf, Height=1.4mm, Manufacturer_Part_Number=GCM21BR71H105KA03L, Mouser Price/Stock=https://www.mouser.co.uk/ProductDetail/Murata-Electronics/GCM21BR71H105KA03L?qs=74rrZF77WIzs3UJkpPZdKw%3D%3D
CDT1 CDT2 Cgda1_2 Cgda2_2 Cgdb1_2 Cgdb2_2 Cgdi1_1_2 Cgdi1_2_2 Cgdi2_1_2 Cgdi2_2_2: "Capacitor", Manufacturer_Name="Murata Electronics", Datasheet Link=https://search.murata.co.jp/Ceramy/image/img/A01X/G101/ENG/GCM21BR72A104MA37-01A.pdf, Height=1.4mm, Manufacturer_Part_Number=GCM21BR72A104MA37K
DCDC_Q1 DCDC_Q2 DCDC_Q3 DCDC_Q4: "Integrated Circuit", Manufacturer_Name="CUI Inc.", Mouser Part Number=490-PQS075-S5-S15-S, Datasheet Link=https://www.cui.com/product/resource/pdf/pqs075-s.pdf, Height=10.41mm, Manufacturer_Part_Number=PQS075-S5-S15-S, Mouser Price/Stock=https://www.mouser.co.uk/ProductDetail/CUI-Inc/PQS075-S5-S15-S/?qs=26oI9%252Bq63sIfifa58tSGNg%3D%3D
FG_1 FG_2: "Connector", Manufacturer_Name="TE Connectivity", Mouser Part Number=571-4139901, Arrow Part Number=413990-1, Arrow Price/Stock=https://www.arrow.com/en/products/413990-1/te-connectivity?region=europe, Datasheet Link=https://www.te.com/commerce/DocumentDelivery/DDEController?Action=srchrtrv&DocNm=1307191_SMB_Connectors&DocType=Catalog%20Section&DocLang=English&PartCntxt=413990-1&DocFormat=pdf, Height=7.62mm, Manufacturer_Part_Number=413990-1, Mouser Price/Stock=https://www.mouser.co.uk/ProductDetail/TE-Connectivity/413990-1?qs=7QuPeZUaY4GhWa7hqv5PMQ%3D%3D
GD1 GD2: "Integrated Circuit", Manufacturer_Name=Skyworks, Mouser Part Number=634-SI8274GB4D-IS1, Datasheet Link=https://www.skyworksinc.com/-/media/Skyworks/SL/documents/public/data-sheets/Si827x.pdf, Height=1.75mm, Manufacturer_Part_Number=SI8274GB4D-IS1, Mouser Price/Stock=https://www.mouser.co.uk/ProductDetail/Skyworks-Solutions-Inc/SI8274GB4D-IS1?qs=j6MGy4L9yX3Ou%2FIj7aSdKQ%3D%3D
IN+ IN- P+ P-: "Connector", Manufacturer_Name=Amphenol, Mouser Part Number=523-AMT0450028DB000G, Datasheet Link=https://www.anytek.com.cn/Upload/AMT45028DB-821f25108d7e4e0caa268ff3448ada5b.pdf, Height=7.4mm, Manufacturer_Part_Number=AMT0450028DB0000G, Mouser Price/Stock=https://www.mouser.co.uk/ProductDetail/Amphenol-Anytek/AMT0450028DB0000G?qs=ST9lo4GX8V0in%252BhOLfQ9xA%3D%3D
Lr1 Lr2: "Inductor", Manufacturer_Name=Bourns, Datasheet Link=https://www.bourns.com/docs/product-datasheets/er26a.pdf, Height=17mm, Manufacturer_Part_Number=ER26A2DC-6R8K
Q1_D Q1_G Q1_S Q2_D Q2_G Q2_S Q3_D Q3_G Q3_S Q4_D Q4_G Q4_S: "Test Point", Manufacturer_Name="Keystone Electronics", Mouser Part Number=534-5013, Manufacturer_Part_Number=5013, Height=8.28mm, Datasheet Link=http://www.keyelco.com/product-pdf.cfm?p=1322, Mouser Price/Stock=https://www.mouser.co.uk/ProductDetail/Keystone-Electronics/5013?qs=qOqV1E1P08RLig9vMFtXag%3D%3D
Q1_HI Q2_LO Q3_HI Q4_LO: "MOSFET (N-Channel)", Manufacturer_Name=Infineon, Mouser Part Number=726-IPW65R050CFD7AXK, Arrow Part Number=IPW65R050CFD7AXKSA1, Arrow Price/Stock=https://www.arrow.com/en/products/ipw65r050cfd7axksa1/infineon-technologies-ag?region=europe, Datasheet Link=https://www.infineon.com/dgdl/Infineon-IPW65R050CFD7A-DataSheet-v02_01-EN.pdf?fileId=5546d46271bf4f920171c0167ea2084c, Height=5.3mm, Manufacturer_Part_Number=IPW65R050CFD7AXKSA1, Mouser Price/Stock=https://www.mouser.co.uk/ProductDetail/Infineon-Technologies/IPW65R050CFD7AXKSA1?qs=OlC7AqGiEDm4ztoS376shw%3D%3D
RDT1 RDT2: "Variable Resistor", Manufacturer_Name=Bourns, Mouser Part Number=652-3224W-1-104G, Arrow Part Number=3224W-1-104G, Arrow Price/Stock=https://www.arrow.com/en/products/3224w-1-104g/bourns, Datasheet Link=https://www.bourns.com/docs/product-datasheets/3224.pdf?sfvrsn=c872982f_10, Height=5.55mm, Manufacturer_Part_Number=3224W-1-104G, Mouser Price/Stock=https://www.mouser.co.uk/ProductDetail/Bourns/3224W-1-104G?qs=tEaODSGlU8NOeIAULE3a4g%3D%3D
RgA_1 RgA_2 RgB_1 RgB_2: "Resistor", Manufacturer_Name="ROHM Semiconductor", Mouser Part Number=755-ESR10EZPF15R0, Datasheet Link=https://fscdn.rohm.com/en/products/databook/datasheet/passive/resistor/chip_resistor/esr-e.pdf, Height=0.65mm, Manufacturer_Part_Number=ESR10EZPF15R0, Mouser Price/Stock=https://www.mouser.co.uk/ProductDetail/ROHM-Semiconductor/ESR10EZPF15R0?qs=DyUWGjl%252BcVuuTlFPYREySw%3D%3D
RgsA_1 RgsA_2 RgsB_1 RgsB_2: "Resistor", Manufacturer_Name="ROHM Semiconductor", Mouser Part Number=755-ESR18EZPF1002, Arrow Part Number=ESR18EZPF1002, Arrow Price/Stock=https://www.arrow.com/en/products/esr18ezpf1002/rohm-semiconductor, Datasheet Link=https://datasheet.datasheetarchive.com/originals/distributors/Datasheets_SAMA/30ccb516c688c96e56c83a00b77a93f4.pdf, Height=0.65mm, Manufacturer_Part_Number=ESR18EZPF1002, Mouser Price/Stock=https://www.mouser.com/Search/Refine.aspx?Keyword=755-ESR18EZPF1002
VDD_DC: "Connector", Arrow Part Number=B02B-XASK-1(LF)(SN), Manufacturer_Name="JST (JAPAN SOLDERLESS TERMINALS)", Mouser Part Number=N/A, Arrow Price/Stock=https://www.arrow.com/en/products/b02b-xask-1-lf-sn/jst-manufacturing?utm_currency=USD&region=europe, Datasheet Link=http://www.jst-mfg.com/product/pdf/eng/eXA1.pdf, Height=8.8mm, Manufacturer_Part_Number=B02B-XASK-1(LF)(SN), Mouser Price/Stock=https://www.mouser.co.uk/ProductDetail/JST-Commercial/B02B-XASK-1LFSN?qs=IKkN%2F947nfBty2GocXf7QA%3D%3D

## Via types
v1: diameter 1.27, hole 0.711, GND to GND/OUTPUT, 167 vias
v2: diameter 1.27/1.27/1.27/1.27 (per signal layer), hole 0.711, GND to GND/OUTPUT, 1 vias

## Nets (pads, with @x,y where several pads share a name; then routed paths per layer and width w, separated by ;. In a path a pad name is that pad's centre, name@x,y a point inside that pad or via, vN(x,y) a via of type N, cw(c..) or ccw(c..) an arc to the next point about the centre after c; other vN are vias at no path point)
NetC1_2: C1.2 C2.1
NetC3_2: C3.2 C4.1
NetC5_2: C5.2 C6.1
NetC7_2: C7.2 C8.1
NetC9_2: C9.2 C10.1
NetC11_2: C11.2 C12.1
NetC13_2: C13.2 C14.1
NetC15_2: C15.2 C16.1
NetC_r1_2: C_r1.2 Lr1.F1
NetCdc_Q1_in_1: Cdc_Q1_in.1 Cdc_Q2_in.1 Cdc_Q3_in.1 Cdc_Q4_in.1 Cgdi1_1_1.1 Cgdi1_1_2.1 Cgdi1_2_1.1 Cgdi1_2_2.1 Cgdi2_1_1.1 Cgdi2_1_2.1 Cgdi2_2_1.1 Cgdi2_2_2.1 DCDC_Q1.2 DCDC_Q2.2 DCDC_Q3.2 DCDC_Q4.2 GD1.3 GD1.5 GD1.8 GD2.3 GD2.5 GD2.8 VDD_DC.1 | length 52
  GND w0.6: Cgdi1_1_1.1 57.24,118.09 57.24,115.51 v1(57.3,115.45) ; Cgdi2_1_1.1 57.185,156.945 57.185,154.075 v1(57.19,154.07) ; v1(60.684,156.484) 60.717,156.451 60.717,154.983 Cgdi2_1_2.1 ; v1(60.7,117.7) 60.725,117.675 60.725,116.175 Cgdi1_1_2.1 ; Cgdi2_2_1.1@60.704,148.175 60.874,148.005 GD2.8 ; Cgdi2_2_1.1 60.727,148.372 Cgdi2_2_2.1@60.727,146.627 ; Cgdi1_1_2.1@60.75,115.85 60.8,115.8 61.918,115.8 62.083,115.635 62.881,115.635 GD1.3 ; Cgdi2_2_2.1 60.761,146.539 60.761,145.489 61.972,144.278 63.872,144.278 v1(64,144.15) ; Cgdi2_1_2.1@60.75,154.65 60.8,154.6 62.01,154.6 62.23,154.38 62.881,154.38 GD2.3 ; v1@60.818,151.832 62.888,151.832 GD2.5 ; Cgdi1_2_1.1@60.82,109.527 61.087,109.26 GD1.8 ; Cgdi1_2_1.1 60.923,109.576 60.923,107.874 Cgdi1_2_2.1 ; v1(60.9,113.05) 60.91,113.06 62.896,113.06 GD1.5 ; Cgdi1_2_2.1@60.99,107.607 60.99,107.06 v1(62.7,105.35) ; DCDC_Q2.2 DCDC_Q2.2@64.358,100.583 ; DCDC_Q1.2 64.358,125.883 64.358,122.722 Cdc_Q1_in.1 ; DCDC_Q4.2 64.336,136.819 64.58,136.575 Cdc_Q4_in.1 ; DCDC_Q3.2 64.358,165.753 64.358,162.822 Cdc_Q3_in.1
  HVDC w0.7: v1(57.19,154.07) 59.41,151.85 v1(60.8,151.85) ; v1(57.3,115.45) 57.309,115.441 58.509,115.441 v1(60.9,113.05)
  GND/OUTPUT w0.6: DCDC_Q2.2 DCDC_Q2.2@64.358,100.583 ; VDD_DC.1@64.39,92.744 VDD_DC.1
NetCdc_Q1_in_2: Cdc_Q1_in.2 Cdc_Q2_in.2 Cdc_Q3_in.2 Cdc_Q4_in.2 CDT1.2 CDT2.2 Cgdi1_1_1.2 Cgdi1_1_2.2 Cgdi1_2_1.2 Cgdi1_2_2.2 Cgdi2_1_1.2 Cgdi2_1_2.2 Cgdi2_2_1.2 Cgdi2_2_2.2 DCDC_Q1.1 DCDC_Q2.1 DCDC_Q3.1 DCDC_Q4.1 FG_1.2 FG_1.3 FG_1.4 FG_1.5 FG_2.2 FG_2.3 FG_2.4 FG_2.5 GD1.4 GD2.4 RDT1.1 RDT2.1 VDD_DC.2 | length 52.8
  GND w0.6: RDT1.1 54.6,109.614 56.136,108.078 57.172,108.078 v1(57.3,107.95) 58.99,107.95 59.04,107.9 Cgdi1_2_2.2 59.09,107.907 59.09,109.589 Cgdi1_2_1.2 ; RDT2.1 54.6,148.33 56.252,146.678 57.272,146.678 v1(57.4,146.55) Cgdi2_2_2.2 58.9,146.6 58.9,148.231 Cgdi2_2_1.2 ; v1(56.75,152.275) 56.931,152.275 57.156,152.5 CDT2.2 ; v1(57.3,113.45) 57.481,113.45 57.681,113.65 CDT1.2@58.65,113.65 ; Cgdi1_1_1.2 58.835,118.135 58.835,116.165 Cgdi1_1_2.2 58.85,113.75 58.9,113.7 CDT1.2 59.25,113.7 CDT1.2@59.3,113.75 ; Cgdi2_1_1.2 58.835,156.935 58.835,154.965 Cgdi2_1_2.2 58.85,152.55 CDT2.2@58.9,152.5 ; CDT1.2@59.3,113.7 59.94,114.34 GD1.4 ; CDT2.2@59.3,152.5 59.885,153.085 GD2.4 ; Cdc_Q1_in.2 61.708,122.788 61.708,125.817 DCDC_Q1.1 ; Cdc_Q3_in.2 61.708,162.888 61.708,165.687 DCDC_Q3.1 ; DCDC_Q2.1@61.708,100.517 DCDC_Q2.1 ; DCDC_Q4.1 61.808,139.338 61.808,136.212 Cdc_Q4_in.2
  GND/OUTPUT w0.6: DCDC_Q2.1 61.708,100.517 61.708,97.388 Cdc_Q2_in.2 61.62,96.925 61.9,96.645 VDD_DC.2
NetCdc_Q1_out_1: Cdc_Q1_out.1 Cgda1_1.1 Cgda1_2.1 DCDC_Q1.4 GD1.16 | length 12.5
  GND w0.6: GD1.16 68.331,118.125 Cgda1_2.1@70.745,118.125 ; Cdc_Q1_out.1@68.306,122.861 Cdc_Q1_out.1@68.395,122.95 ; GD1.16@68.575,118.175 68.575,122.184 68.565,122.194 68.565,122.78 Cdc_Q1_out.1@68.395,122.95 ; DCDC_Q1.4 69.416,124.216 68.565,123.365 68.565,123.12 Cdc_Q1_out.1@68.395,122.95 ; Cgda1_2.1@70.73,118.095 70.745,118.11 72.385,118.11 Cgda1_1.1@72.4,118.095
NetCdc_Q2_out_1: Cdc_Q2_out.1 Cgdb1_1.1 Cgdb1_2.1 DCDC_Q2.4 GD1.11 | length 24.4
  GND w0.6: GD1.11 68.318,111.787 70.587,111.787 Cgdb1_2.1 70.65,111.825 Cgdb1_1.1@72.13,111.825 ; Cgdb1_1.1 72.545,111.895 73.6,110.84 v1(73.6,110.8)
  HVDC w0.7: DCDC_Q2.4 69.416,103.362 70.4,104.346 v1(70.4,104.5) 73.15,104.5 73.6,104.95 v1(73.6,110.8)
  GND/OUTPUT w0.6: DCDC_Q2.4 69.244,100.777 69.244,101.666 68.516,102.394 Cdc_Q2_out.1 68.516,102.884 70.004,104.372 70.272,104.372 v1(70.4,104.5)
NetCdc_Q3_out_1: Cdc_Q3_out.1 Cgda2_1.1 Cgda2_2.1 DCDC_Q3.4 GD2.16 | length 13.3
  GND w0.6: GD2.16@68.321,156.88 70.592,156.88 70.607,156.865 70.657,156.915 72.227,156.915 Cgda2_1.1 ; GD2.16@68.476,156.88 68.516,156.92 Cdc_Q3_out.1 68.516,163.22 69.416,164.12 DCDC_Q3.4
NetCdc_Q4_out_1: Cdc_Q4_out.1 Cgdb2_1.1 Cgdb2_2.1 DCDC_Q4.4 GD2.11 | length 20.2
  GND w0.6: GD2.11 68.316,150.555 70.597,150.555 70.657,150.615 72.227,150.615 Cgdb2_1.1 72.552,150.695 73.6,149.647 v1(73.6,149.6)
  HVDC w0.7: v1(68.6,143.45) 71.1,143.45 73.6,145.95 v1(73.6,149.6)
  GND/OUTPUT w0.6: v1(68.6,143.45) 68.558,143.408 68.558,141.592 Cdc_Q4_out.1 68.516,140.25 DCDC_Q4.4
  GND/OUTPUT w0.7: DCDC_Q4.4 DCDC_Q4.4@69.416,139.566
NetCDT1_1: CDT1.1 GD1.6 RDT1.2 RDT1.3 | length 12.1
  GND w0.6: RDT1.2 51.55,111.064 52.6,112.114 RDT1.3 58.386,112.114 58.7,111.8 CDT1.1 GD1.6
NetCDT2_1: CDT2.1 GD2.6 RDT2.2 RDT2.3 | length 12
  GND w0.6: RDT2.3 58.47,150.83 58.75,150.55 CDT2.1@58.95,150.55 ; CDT2.1@59.03,150.57 62.881,150.57 GD2.6
  GND w0.7: RDT2.2@51.55,149.95 51.55,150.15 52.19,150.79 52.6,151.2 RDT2.3@54.45,151.2
NetFG_1_1: FG_1.1 GD1.1 | length 12.4
  GND w0.6: FG_1.1 56.15,119.25 56.626,119.726 60.924,119.726 62.456,118.194 62.456,118.175 62.481,118.15 GD1.1
NetFG_2_1: FG_2.1 GD2.1 | length 12.6
  GND w0.6: FG_2.1 51.85,158.45 56.021,158.45 56.421,158.85 60.55,158.85 61.1,158.3 62.456,156.944 62.456,156.92 GD2.1@62.881,156.92
NetGD1_10: GD1.10 RgB_1.1 | length 5.6
  GND w0.6: GD1.10@67.825,110.53 71.37,110.53 72.65,109.25 RgB_1.1
NetGD1_15: GD1.15 RgA_1.1 | length 6.4
  GND w0.6: GD1.15 73.649,116.88 74,116.529 74,116.425 74.2,116.225 RgA_1.1
NetGD2_10: GD2.10 RgB_2.1 | length 5
  GND w0.6: GD2.10 71.625,149.275 72.65,148.25 RgB_2.1
NetGD2_15: GD2.15 RgA_2.1 | length 6.2
  GND w0.6: GD2.15 73.547,155.625 74.107,155.065 RgA_2.1@74.307,155.065
NetLr1_S1: Lr1.S1 P+.1 P+.2 P+.3 P+.4
  other v1: 147,179 145.5,180.75 148.5,180.75 146.75,182 150,182.5 148.25,183.5 151.5,184.25 149.5,185 153,186 151,186.75 154.25,187.25 152.75,188.25 155.75,188.5 154.25,189.5
NetLr2_F1: Lr2.F1 P-.1 P-.2 P-.3 P-.4
  other v1: 134.25,181.5 124.5,182 136.25,182.25 132,182.5 125,183.5 131,184 127,184.5 124.5,185 132.25,185.25 138.5,185.25 127.75,186.25 133.75,186.25 124.75,186.75 140,186.75 129,187.25 136.5,187.25 130.25,187.75 124.75,188.25 127.25,188.5 140.75,188.5 132.25,188.75 128.75,189.5 137.5,189.5 141.25,189.5 134.25,190 130.25,190.5 138,190.75 135.5,191.25 131,191.75 138,191.75 147.75,192.5 132.5,193 133.75,194.5 146.25,198.5
Q1_D: C1.1 C3.1 C5.1 C7.1 C9.1 C11.1 C13.1 C15.1 C_in.1 C_in_2.1 IN+.1 IN+.2 IN+.3 IN+.4 Q1_D.1 Q1_HI.2 Q3_D.1 Q3_HI.2
  other v1: 114.5,102.636 116.5,102.636 118.5,102.636 120.5,102.636 114.5,104.79 116.5,104.79 118.5,104.79 120.5,104.79 114.5,106.943 116.5,106.943 118.5,106.943 120.5,106.943 114.5,109.097 116.5,109.097 118.5,109.097 120.5,109.097 114.5,111.25 116.5,111.25 118.5,111.25 120.5,111.25 113.5,144 115.5,144 117.5,144 119.5,144 121.5,144 123.5,144 113.5,146.182 115.5,146.182 117.5,146.182 119.5,146.182 121.5,146.182 123.5,146.182 113.5,148.364 115.5,148.364 117.5,148.364 119.5,148.364 121.5,148.364 123.5,148.364 113.5,150.545 115.5,150.545 117.5,150.545 119.5,150.545 121.5,150.545 123.5,150.545 113.5,152.727 115.5,152.727 117.5,152.727 119.5,152.727 121.5,152.727 123.5,152.727 113.5,154.909 115.5,154.909 117.5,154.909 119.5,154.909 121.5,154.909 123.5,154.909 113.5,157.091 115.5,157.091 117.5,157.091 119.5,157.091 121.5,157.091 123.5,157.091 113.5,159.273 115.5,159.273 117.5,159.273 119.5,159.273 121.5,159.273 123.5,159.273 113.5,161.455 115.5,161.455 117.5,161.455 119.5,161.455 121.5,161.455 123.5,161.455 113.5,163.636 115.5,163.636 117.5,163.636 119.5,163.636 121.5,163.636 123.5,163.636 113.5,165.818 115.5,165.818 117.5,165.818 119.5,165.818 121.5,165.818 123.5,165.818 113.5,168 115.5,168 117.5,168 119.5,168 121.5,168 123.5,168
Q1_G: Q1_G.1 Q1_HI.1 RgA_1.2 RgsA_1.1 | length 13.1
  GND w0.6: RgA_1.2 74.762,118.125 74.775,118.137 76.587,118.137 RgsA_1.1 76.925,118.15 82.052,123.277 Q1_HI.1
Q1_S: C_r1.1 Cdc_Q1_out.2 Cgda1_1.2 Cgda1_2.2 DCDC_Q1.3 GD1.14 Q1_HI.3 Q1_S.1 Q2_D.1 Q2_LO.2 RgsA_1.2 | length 16.8
  GND w0.6: Cdc_Q1_out.2@66.815,123.01 Cdc_Q1_out.2 ; DCDC_Q1.3 Cdc_Q1_out.2 ; v2(66.95,121.2) 66.913,121.237 66.913,122.913 Cdc_Q1_out.2 ; GD1.14 68.331,115.635 70.065,115.635 v1@70.1,115.6 ; Cgda1_2.2@70.7,120.025 70.7,121.275 71.425,122 v1(72.4,122) ; Cgda1_1.2@72.4,119.735 v1(72.4,122) ; RgsA_1.2 76.275,121.05 75.275,122.05 72.45,122.05 v1(72.4,122)
  other v1: 70,115.6
Q2_G: Q2_G.1 Q2_LO.1 RgB_1.2 RgsB_1.1 | length 12.9
  GND w0.6: RgB_1.2 74.575,109.075 76.575,109.075 RgsB_1.1 76.925,109.05 82.115,103.86 Q2_LO.1
Q2_S: C2.2 C4.2 C6.2 C8.2 C10.2 C12.2 C14.2 C16.2 C_in.2 C_in_2.2 Cdc_Q2_out.2 Cdc_Q4_out.2 Cgdb1_1.2 Cgdb1_2.2 Cgdb2_1.2 Cgdb2_2.2 DCDC_Q2.3 DCDC_Q4.3 GD1.9 GD2.9 IN-.1 IN-.2 IN-.3 IN-.4 Q2_LO.3 Q2_S.1 Q4_LO.3 Q4_S.1 RgsB_1.2 RgsB_2.2 | length 14.2
  GND w0.6: GD1.9 68.311,109.255 70.395,109.255 v1(70.4,109.25) ; GD2.9 68.328,148.027 69.978,148.027 v1(70,148.05) ; RgsB_1.2@76.275,111.95 RgsB_1.2
  GND/OUTPUT w0.6: DCDC_Q2.3 Cdc_Q2_out.2 66.876,104.52 67.425,105.069 v1(67.425,105.25) ; DCDC_Q4.3 Cdc_Q4_out.2 66.925,141.6 66.925,144.475 v1(66.975,144.525)
  other v1: 74.3,113.55 74.3,151.95
Q3_G: Q3_G.1 Q3_HI.1 RgA_2.2 RgsA_2.1 | length 13.2
  GND w0.6: RgA_2.2@74.307,156.965 74.425,157.082 76.183,157.082 76.3,157.2 76.925,157.2 81.282,161.557 Q3_HI.1@85.6,161.557
Q3_S: Cdc_Q3_out.2 Cgda2_1.2 Cgda2_2.2 DCDC_Q3.3 GD2.14 Lr2.S1 Q3_HI.3 Q3_S.1 Q4_D.1 Q4_LO.2 RgsA_2.2 | length 17.2
  GND w0.6: DCDC_Q3.3 Cdc_Q3_out.2 66.963,162.888 66.963,161.237 v1(67.05,161.15) ; GD2.14@68.326,154.352 68.348,154.33 70.42,154.33 v1(70.5,154.25) ; Cgda2_2.2@70.607,158.765 70.607,160.243 71.287,160.922 72.172,160.922 v1(72.3,161.05) ; Cgda2_1.2 72.304,158.639 72.304,161.046 v1(72.3,161.05) ; RgsA_2.2@76.3,160.1 75.975,160.1 75.025,161.05 v1(72.3,161.05)
Q4_G: Q4_G.1 Q4_LO.1 RgB_2.2 RgsB_2.1 | length 14
  GND w0.6: RgB_2.2 74.558,148.057 RgsB_2.1@76.6,148.057 ; RgsB_2.1 76.6,146.92 80.91,142.61 Q4_LO.1@85.6,142.61
pads on no net: GD1.2 GD1.7 GD1.12 GD1.13 GD2.2 GD2.7 GD2.12 GD2.13

## Polygon pours and split planes (outlines as drawn)
NetCdc_Q1_in_1 on GND/OUTPUT "NETCDC_Q1_IN_1_L04_P074" (solid, pour order 74): 64.075,89.225 63.1,90.143 63.1,101.35 59.625,104.825 59.625,118.425 60.775,119.575 61.975,119.575 63.1,120.75 63.1,140.9 59.15,144.85 59.15,156.825 63.125,160.8 63.125,168.025 63.8,168.7 65.3,168.7 65.65,168.35 65.65,89.95 64.925,89.225
NetC_r1_2 on GND/OUTPUT "NETC_R1_2_L04_P067" (solid, pour order 67): 130.5,163 130.5,158 135,153.5 149.5,153.5 153,157 153,166.5 151.5,168 135.5,168
NetLr2_F1 on GND/OUTPUT "NETLR2_F1_L04_P066" (solid, pour order 66): 108.5,188.5 108.5,182 111,179.5 138,179.5 151.5,194 151.5,212.5 149,215 136,215 132.5,211.5 132.5,196.5 126,190 110,190
Q3_S on GND/OUTPUT "GND/OUTPUT-Q3_S" (solid, pour order 53): 65.925,153.5 72,153.5 80.5,162 80.5,165.875 84.51,169.885 88.615,169.885 90.5,168 90.5,152.989 88.51,150.998 84.51,150.998 83.01,149.498 83.01,146.998 84.51,145.498 92.498,145.498 107.5,160.5 107.5,189.5 106.5,190.5 96.5,190.5 91,185 91,177.981 88.51,175.49 88.51,175.385 84.51,175.385 73,175.5 65.925,168.425
Q1_S on GND/OUTPUT "GND/OUTPUT-Q1_S" (solid, pour order 52): 96.5,114 133.5,114 146.5,127 146.5,141 142,145.5 133,145.5 119.5,132 96.5,132 91.395,137.105 84.51,137.105 84.404,137 72.78,137 66.025,130.245 66.025,114.695 66.47,114.25 71.03,114.25 80.5,123.72 80.5,127.596 84.51,131.605 88.51,131.605 89.248,130.867 89.248,113.06 88.437,112.248 84.437,112.248 82.937,110.748 82.937,108.248 84.437,106.748 89.248,106.748
NetLr1_S1 on GND/OUTPUT "NETLR1_S1_L04_P049" (solid, pour order 49): 144.5,169 142,171.5 142,179.6 144.5,182.1 153.5,191.5 153.5,206.5 161.5,214.5 173,214.5 177.5,210 177.5,193.5 171,187 157,187 153,183 153,169
Q2_S on SIG "SIG-Q2_S" (solid, pour order 91): 81.6,149.25 83.6,151.25 88.1,151.25 88.6,151.75 88.6,155.25 87.6,156.25 80,156.25 77,153.25 71.6,153.25 69.85,151.5 66.85,151.5 66.025,150.675 66.025,137.325 76.675,137.325 81.6,142.25
Q1_D on SIG "SIG-Q1_D" (solid, pour order 79): 104,138 99.5,133.72 87.5,133.72 83,129.22 83,127.22 85,125.22 99.5,125.22 104,120.72 104,101.375 115.35,90.025 173.85,90.025 173.85,107.025 140.05,107.025 127.25,119.825 127.25,172.125 123.35,176.025 110.85,176.025 106.85,172.025 106.85,172 87.5,172 83,167.5 83,165.5 85,163.5 99.5,163.5 104,159
NetCdc_Q1_in_2 on SIG "NETCDC_Q1_IN_2_L02_P070" (solid, pour order 70): 65.125,89.25 66.975,91.1 67,91.525 67,94.5 65.475,96.025 65.475,168.025 62.5,171 54.75,171 46.5,162.75 46.5,102 59.25,89.25
Q2_S on SIG "SIG-Q2_S" (solid, pour order 60): 81.5,110.5 83.5,112.5 88,112.5 88.5,113 88.5,116.5 87.5,117.5 79.9,117.5 76.9,114.5 71.5,114.5 69.75,112.75 66.75,112.75 65.925,111.925 65.925,98.575 66.75,97.75 75.75,97.75 81.5,103.5
NetLr1_S1 on HVDC "NETLR1_S1_L03_P080" (solid, pour order 80): 144.627,168.873 142.127,171.373 142.127,179.473 144.627,181.973 153.627,191.373 153.627,206.373 161.627,214.373 173.127,214.373 177.627,209.873 177.627,193.373 171.127,186.873 157.127,186.873 153.127,182.873 153.127,168.873
Q1_D on HVDC "HVDC-No Net" (solid, pour order 78): 104,138 99.5,133.72 87.5,133.72 83,129.22 83,127.22 85,125.22 99.5,125.22 104,120.72 104,101.375 115.35,90.025 173.85,90.025 173.85,107.025 140.05,107.025 127.25,119.825 127.25,172.125 123.35,176.025 110.85,176.025 106.85,172.025 106.85,172 87.5,172 83,167.5 83,165.5 85,163.5 99.5,163.5 104,159
NetC_r1_2 on HVDC "NETC_R1_2_L03_P048" (solid, pour order 48): 130.5,163 130.5,158 135,153.5 149.5,153.5 153,157 153,166.5 151.5,168 135.5,168
NetLr2_F1 on HVDC "NETLR2_F1_L03_P047" (solid, pour order 47): 108.5,188.5 108.5,182 111,179.5 138,179.5 151.5,194 151.5,212.5 149,215 136,215 132.5,211.5 132.5,196.5 126,190 110,190
Q1_D on GND "Q1_D_L01_P090" (solid, pour order 90): 111,176 108.5,173.5 108.5,103.5 111,101 125,101 127,103 127,173 124,176
NetC9_2 on GND "NETC9_2_L01_P089" (solid, pour order 89): 100.5,109.501 102.009,111.01 106.009,111.01 107.5,109.519 107.5,106.001 105.924,104.425 102.095,104.425 100.5,106.019
NetC15_2 on GND "NETC15_2_L01_P088" (solid, pour order 88): 100.5,116.501 102.009,118.01 106.009,118.01 107.5,116.519 107.5,113.001 105.924,111.425 102.095,111.425 100.5,113.019
NetC13_2 on GND "NETC13_2_L01_P087" (solid, pour order 87): 100.5,123.501 102.009,125.01 106.009,125.01 107.5,123.519 107.5,120.001 105.924,118.425 102.095,118.425 100.5,120.019
NetC11_2 on GND "NETC11_2_L01_P086" (solid, pour order 86): 100.5,130.501 102.009,132.01 106.009,132.01 107.5,130.519 107.5,127.001 105.924,125.425 102.095,125.425 100.5,127.019
NetC1_2 on GND "NETC1_2_L01_P085" (solid, pour order 85): 100.5,147.741 102.009,149.25 106.009,149.25 107.5,147.759 107.5,144.241 105.924,142.665 102.095,142.665 100.5,144.259
NetC3_2 on GND "NETC3_2_L01_P084" (solid, pour order 84): 100.5,154.741 102.009,156.25 106.009,156.25 107.5,154.759 107.5,151.241 105.924,149.664 102.095,149.664 100.5,151.259
NetC5_2 on GND "NETC5_2_L01_P083" (solid, pour order 83): 100.5,161.741 102.009,163.25 106.009,163.25 107.5,161.759 107.5,158.241 105.924,156.664 102.095,156.664 100.5,158.259
NetC7_2 on GND "NETC7_2_L01_P082" (solid, pour order 82): 100.5,168.741 102.009,170.25 106.009,170.25 107.5,168.759 107.5,165.241 105.924,163.664 102.095,163.664 100.5,165.259
Q2_S on GND "GND-Q2_S" (solid, pour order 65): 174.1,106.9 174,107 136,107 127.5,98.2 106.8,98.2 99.5,105.5 99.5,176.7 96.6,176.7 92.6,172.7 92.6,157.777 91.073,156.25 79.973,156.25 76.723,153 69.823,153 69.573,152.75 69.573,151.75 69.823,151.5 73.5,151.5 75.75,149.25 81.573,149.25 83.573,151.25 91,151.25 91,117.5 79.9,117.5 76.9,114.5 70,114.5 69.5,114 69.5,113 69.75,112.75 73.75,112.75 76,110.5 81.5,110.5 83.5,112.5 91,112.5 92.6,110.9 92.6,98.2 118.1,72.7 174.1,72.7